# Altium PCB USBHUB.PcbDoc
Units mm, origin at the board's own origin, x right, y up, seen from the top; angles counter-clockwise.
Board outline 31.37 x 90.68 mm, 2 copper layers (Top Layer, Bottom Layer); 37 components, 26 nets, 182 pads, 0 vias.
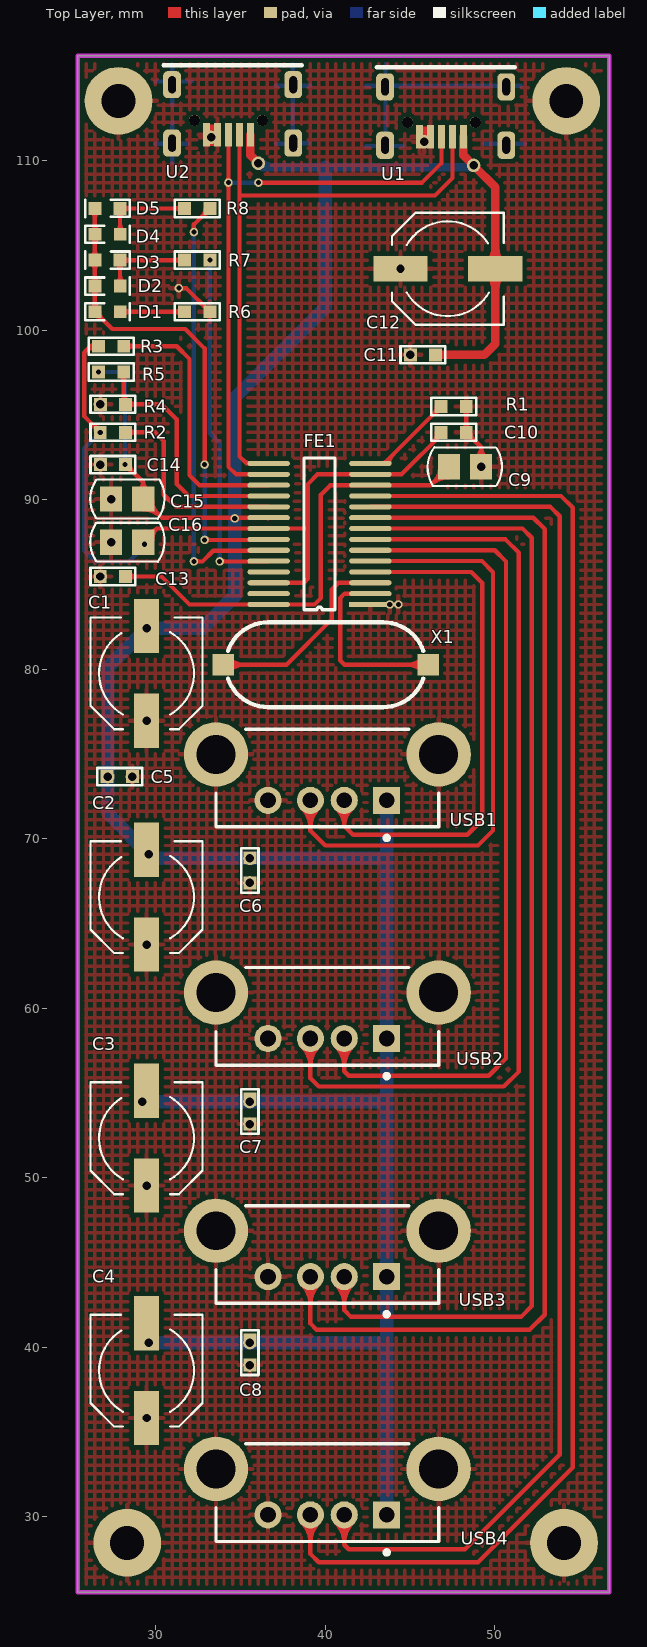
[diagram p0: Top Layer view]
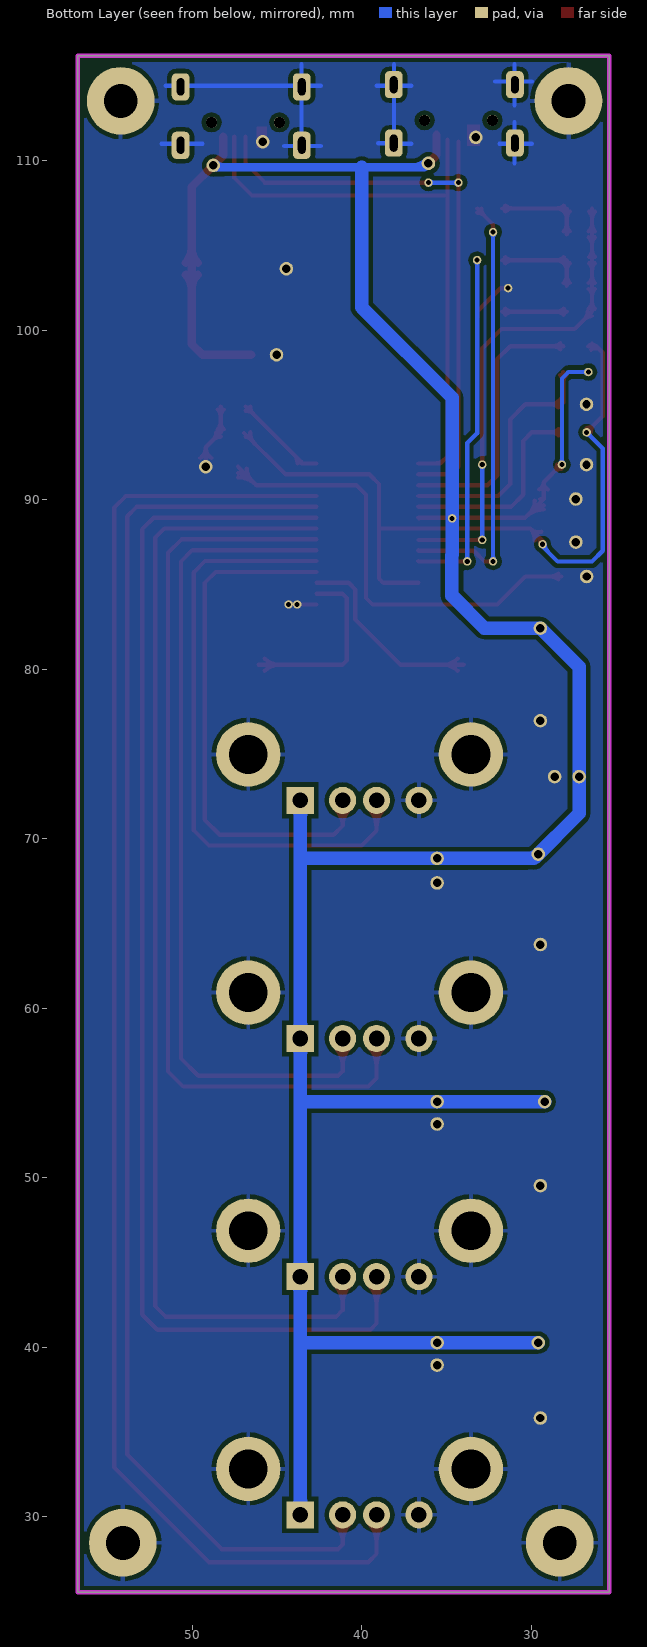
[diagram p1: Bottom Layer view, seen from below]

## Layer stack, top to bottom
Top Solder: solder mask 0.0102, Solder Resist, Dk 3.5
Top Layer: signal copper 0.0356
Dielectric1: dielectric 0.32, FR-4, Dk 4.8
Bottom Layer: signal copper 0.0356
Bottom Solder: solder mask 0.0102, Solder Resist, Dk 3.5

## Board outline
25.4,116.205 56.769,116.205 56.769,25.527 25.4,25.527 25.4,116.205

## Design rules (kind name [scope] priority, off if disabled: settings)
Clearance [All] p1: gap=0.254 ignorepadtopadclearanceinfootprint=FALSE except(0: Arc-Hole Track-Hole SMDPad-Hole THPad-Hole Via-Hole Fill-Hole Poly-Hole Region-Hole Text-Hole)
FabricationTestPointUsage TestPointUsage [All] p1: valid=0 allowmultiple=FALSE
FabricationTestpoint Testpoint [All] p1: side=3 testpointundercomponent=TRUE minsize=1.016 maxsize=2.54 preferedsize=1.524 minholesize=0 maxholesize=1.016 preferedholesize=0.813 testpointgrid=0.025 allowsidetop=TRUE allowsidebottom=TRUE usegrid=TRUE gridtolerance=0
PolygonConnect [All] p1: connectstyle=Relief reliefconductorwidth=0.254 reliefentries=4 polygonreliefangle="90 Angle" airgapwidth=0.254
RoutingVias [All] p1: holewidth=0.711 width=1.27 viastyle="Through Hole" minholewidth=0.711 minwidth=1.27 maxholewidth=0.711 maxwidth=1.27
SilkToSolderMaskClearance SilkscreenOverComponentPads [IsPad] p1: minsilkscreentomaskgap=0.254 clearancetoexposedcopper=TRUE
SolderMaskExpansion [All] p1: expansion=0.102
Width [All] p1: maxlimit=2 minlimit=0.254 preferedwidth=0.254
27 further rules are at their usual default settings.

## Components (designator, comment, footprint, x,y, rotation, side; value= is the part's Value field where it differs from the comment)
C1 "Cap_Pol" cap_220uF/16V 29.464,79.756 r90 top
C2 "Cap_Pol" cap_220uF/16V 29.464,66.548 r90 top
C3 "Cap_Pol" cap_220uF/16V 29.464,52.324 r90 top
C4 "Cap_Pol" cap_220uF/16V 29.464,38.608 r90 top
C5 "Cap1" 0603 27.94,73.66 r180 top
C6 "Cap1" 0603 35.56,68.072 r90 top
C7 "Cap1" 0603 35.56,53.848 r90 top
C8 "Cap1" 0603 35.56,39.624 r90 top
C9 "Cap1" 2012[0805]-C 48.26,91.948 r180 top
C10 "Cap1" 0603 47.647,93.98 r180 top
C11 "Cap1" 0603 45.72,98.552 r0 top
C12 "Cap_Pol" cap_220uF/16V 47.244,103.632 r0 top
C13 "Cap1" 0603 27.534,85.471 r180 top
C14 "Cap1" 0603 27.429,92.075 r0 top
C15 "Cap1" 2012[0805]-C 28.321,90.043 r0 top
C16 "Cap1" 2012[0805]-C 28.321,87.503 r0 top
D1 "LED" 0603-Polar 27.111,101.092 r0 top
D2 "LED" 0603-Polar 27.111,102.616 r0 top
D3 "LED" 0603-Polar 27.216,104.14 r180 top
D4 "LED" 0603-Polar 27.111,105.664 r0 top
D5 "LED" 0603-Polar 27.216,107.188 r180 top
FE1 "FE1.1s" SSOP-28 42.672,83.82 r180 top
R1 "Res1" 0603 47.647,95.504 r180 top
R2 "Res1" 0603 27.534,93.98 r180 top
R3 "Res1" 0603 27.432,99.06 r180 top
R4 "Res1" 0603 27.429,95.631 r0 top
R5 "Res1" 0603 27.432,97.536 r180 top
R6 "Res1" 0603 32.512,101.092 r180 top
R7 "Res1" 0603 32.512,104.14 r180 top
R8 "Res1" 0603 32.512,107.188 r180 top
U1 "Micro-USB" MICRO-USB-F 47.117,113.665 r180 top
U2 "Micro-USB" MICRO-USB-F 34.544,113.792 r180 top
USB1 "USB" USB2.5-2V4A 40.132,76.454 r90 top
USB2 "USB" USB2.5-2V4A 40.132,62.399 r90 top
USB3 "USB" USB2.5-2V4A 40.132,48.345 r90 top
USB4 "USB" USB2.5-2V4A 40.132,34.29 r90 top
X1 "12M" XTAL_SMD 37.592,80.264 r0 top

## Footprints (in the part's own frame and the unit in brackets; to place one, negate y for a bottom-side part, rotate by r counter-clockwise, add the part's x,y. Pads: shape width x height; smd on the part's side, far side on the other; paste and mask are expansions set on the pad)
0603 [mil]
  rect 30x30 smd: 1(-27,0) 2(31.5,0)
  silkscreen extent -50,-20 54,20
0603-Polar [mil]
  rect 30x30 smd: 1(-27,0) 2(31.5,0)
  silkscreen extent -50,-20 54,20
2012[0805]-C [mm] "Chip Resistor; Body 2.0 x 1.3 mm (LxW typ)"
  rect 1.3x1.5 smd: 1(-0.95,0) 2(0.95,0)
  silkscreen extent -2.17,-1.16 2.21,1.14
cap_220uF/16V [mm]
  rect 3.2x1.5 smd: 1(-2.794,0) 2(2.8,0)
  silkscreen extent -3.3,-3.3 3.3,3.3
MICRO-USB-F [mm]
  rrect50% 1.05x1.6 hole 0.45 slot 1 at 90 deg: 0(-3.575,-0.7) 0(-3.575,2.75) 0(3.575,-0.7) 0(3.575,2.75)
  round 0.65 hole 0.65: 0(-1.75,1.4) 0(2.25,1.4)
  rect 0.4x1.4 smd: 1(-1.05,2.25) 2(-0.403,2.25) 3(0.246,2.25) 4(0.897,2.25) 5(1.546,2.25)
  silkscreen extent -4.08,-1.85 4.08,-1.85
SSOP-28 [mm]
  rect 2.5x0.3 smd: 1(0,0)
  oval 2.5x0.3 smd: 2(0,-0.64) 3(0,-1.28) 4(0,-1.92) 5(0,-2.56) 6(0,-3.2) 7(0,-3.84) 8(0,-4.48) 9(0,-5.12) 10(0,-5.76) 11(0,-6.4) 12(0,-7.04) 13(0,-7.68) 14(0,-8.32) 15(6,-8.32) 16(6,-7.68) 17(6,-7.04) 18(6,-6.4) 19(6,-5.76) 20(6,-5.12) 21(6,-4.48) 22(6,-3.84) 23(6,-3.2) 24(6,-2.56) 25(6,-1.92) 26(6,-1.28) 27(6,-0.64) 28(6,0)
  silkscreen extent 2.08,-8.64 3.92,0.32
USB2.5-2V4A [mm] "Connector; USB1.1, Type A, Thru-Hole; 4 Position; Vertical"
  rect 1.6x1.6 hole 0.92: 1(-4.19,-3.5)
  round 1.6 hole 0.92: 2(-4.19,-1) 3(-4.19,1) 4(-4.19,3.5)
  round 3.8 hole 2.3: 5(-1.48,6.57) 6(-1.48,-6.57)
  silkscreen extent -6.53,-6.57 0,6.57, body extent -5.76,-6.57 0,6.57, height 15
XTAL_SMD [mm]
  rect 1.27x1.27 smd: 1(-3.61,0) 2(8.49,0)
  silkscreen extent -3.33,-2.5 8.21,2.5

## Part data
C1 C2 C3 C4 C5 C6 C7 C8 C9 C10 C11 C12 C13 C14 C15 C16: "Capacitor"
D1 D2 D3 D4 D5: library part LED1, "Typical INFRARED GaAs LED"
R1 R2 R3 R4 R5 R6 R7 R8: "Resistor"
X1: library part XTAL_1, "Crystal Oscillator"

## Free pads (board coordinates)
  round 0.5 hole 0.3: 4(32.893,92.075) 7(32.258,105.791) 9(32.258,86.36) 10(32.893,87.63) 11(33.198,104.14) 12(33.782,86.36) 14(26.734,93.98) 15(29.337,87.376) 16(28.194,92.075) 17(26.632,97.536) 23(36.068,108.712) 24(34.298,108.712) 33(34.671,88.9) 54(31.369,102.489) 55(43.815,83.82) 56(44.323,83.82)
  round 0.8 hole 0.5: 21(36.068,109.855) 22(48.768,109.728) 25(29.464,82.423) 26(29.591,69.088) 27(29.21,54.483) 28(29.591,40.259) 29(27.178,73.66) 30(35.56,68.834) 31(35.56,54.483) 32(35.56,40.259) 38(33.274,111.379) 39(45.847,111.125) 40(26.743,95.631) 41(26.743,92.075) 42(27.371,90.043) 43(27.371,87.503) 44(26.734,85.471) 45(29.464,76.962) 46(29.464,63.754) 47(29.464,49.53) 48(29.464,35.814) 49(35.56,38.938) 50(35.56,53.162) 51(35.56,67.386) 52(28.626,73.66) 57(45.034,98.552) 58(44.45,103.632) 59(49.21,91.948)
  round 4 hole 2: 34(27.813,113.538) 35(54.229,113.538) 36(54.102,28.448) 37(28.321,28.448)

## Nets (pads, with @x,y where several pads share a name; then routed paths per layer and width w, separated by ;. In a path a pad name is that pad's centre, name@x,y a point inside that pad or via, vN(x,y) a via of type N, cw(c..) or ccw(c..) an arc to the next point about the centre after c; other vN are vias at no path point)
GND: C1.1 C2.1 C3.1 C4.1 C5.1 C6.1 C7.1 C8.1 C9.1 C10.1 C11.1 C12.1 C13.2 C14.1 C15.1 C16.1 FE1.1 pad.34 pad.35 pad.36 pad.37 pad.38 pad.39 pad.40 pad.41 pad.42 pad.43 pad.44 pad.45 pad.46 pad.47 pad.48 pad.49 pad.50 pad.51 pad.52 pad.54 pad.55 pad.56 pad.57 pad.58 pad.59 R1.1 R4.1 R6.1 U1.4 U1.5 U2.4 U2.5 USB1.4 USB1.5 USB1.6 USB2.4 USB2.5 USB2.6 USB3.4 USB3.5 USB3.6 USB4.4 USB4.5 USB4.6 | length 12.6
  Top Layer w0.254: pad.54 31.801,102.489 R6.1 R6.1@33.198,100.787 ; FE1.1 pad.55 pad.56 ; C10.1@48.153,94.16 ccw(c47.72,94.593) 48.333,94.593 ccw(c48.946,94.593) C10.1@48.512,94.16 ; R1.1@48.153,95.324 cw(c47.72,94.891) 48.333,94.891 cw(c48.946,94.891) R1.1@48.512,95.324 ; C10.1@48.333,93.726 cw(c48.333,93.113) 48.766,93.546 cw(c49.2,93.98) C10.1@48.587,93.98 ; R1.1 C10.1 49.21,93.103 ; C9.1@48.893,92.464 ccw(c48.408,93.103) 49.21,93.103 ; C9.1 49.21,93.103 ; C9.1@49.527,92.464 cw(c50.012,93.103) 49.21,93.103
NetD1_1: D1.1 D2.1 D3.2 D4.1 D5.2 FE1.22 pad.4 pad.10 | length 39
  Top Layer w0.254: D3.2@26.236,103.96 cw(c25.803,103.527) 26.416,103.527 cw(c27.029,103.527) D3.2@26.596,103.96 ; D3.2@26.236,104.32 ccw(c25.803,104.753) 26.416,104.753 ccw(c27.029,104.753) D3.2@26.596,104.32 ; D5.2@26.236,107.008 cw(c25.803,106.575) 26.416,106.575 cw(c27.029,106.575) D5.2@26.596,107.008 ; D1.1@26.246,101.272 ccw(c25.834,101.683) 26.416,101.683 ; D2.1@26.246,102.436 cw(c25.834,102.025) 26.416,102.025 ; D2.1@26.246,102.796 ccw(c25.834,103.207) 26.416,103.207 ; D4.1@26.246,105.484 cw(c25.834,105.073) 26.416,105.073 ; D4.1@26.246,105.844 ccw(c25.834,106.255) 26.416,106.255 ; 26.416,101.727 ccw(c27.061,101.727) D1.1@26.605,101.272 ; 26.416,101.981 cw(c27.061,101.981) D2.1@26.605,102.436 ; 26.416,103.251 ccw(c27.061,103.251) D2.1@26.605,102.796 ; 26.416,105.029 cw(c27.061,105.029) D4.1@26.605,105.484 ; 26.416,106.299 ccw(c27.061,106.299) D4.1@26.605,105.844 ; D5.2 D3.2 26.416,101.101 D1.1 27.441,100.076 31.75,100.076 32.893,98.933 pad.4 ; D1.1@26.425,100.838 cw(c26.425,100.225) 26.859,100.658 cw(c27.292,101.092) D1.1@26.679,101.092 ; pad.4@32.806,92.162 ccw(c32.596,92.372) 32.893,92.372 ccw(c33.19,92.372) pad.4@32.98,92.162 ; pad.10 FE1.22@36.642,87.63 ; pad.10@32.98,87.543 cw(c33.19,87.333) 33.19,87.63 cw(c33.19,87.927) pad.10@32.98,87.717
  Bottom Layer w0.254: pad.10@32.806,87.717 ccw(c32.596,87.927) 32.893,87.927 ccw(c33.19,87.927) pad.10@32.98,87.717 ; pad.4@32.806,91.988 cw(c32.596,91.778) 32.893,91.778 cw(c33.19,91.778) pad.4@32.98,91.988 ; pad.10 pad.4
NetD1_2: D1.2 R6.2 | length 5.7
  Top Layer w0.254: D1.2 R6.2 ; D1.2@28.091,100.912 cw(c28.524,100.479) 28.524,101.092 cw(c28.524,101.705) D1.2@28.091,101.272 ; R6.2@31.532,100.912 ccw(c31.099,100.479) 31.099,101.092 ccw(c31.099,101.705) R6.2@31.532,101.272
NetD2_2: D2.2 D3.1 R7.2 | length 9.2
  Top Layer w0.254: D3.1@27.722,103.96 cw(c27.289,103.527) 27.902,103.527 cw(c28.515,103.527) 28.081,103.96 cw(c28.515,103.527) 28.515,104.14 cw(c28.515,104.753) D3.1@28.081,104.32 ; D2.2@27.731,102.796 ccw(c27.32,103.207) 27.902,103.207 ; D2.2@27.902,102.625 D3.1 R7.2 ; 27.902,103.251 ccw(c28.546,103.251) D2.2@28.091,102.796 ; R7.2@31.532,103.96 ccw(c31.099,103.527) 31.099,104.14 ccw(c31.099,104.753) R7.2@31.532,104.32
NetD4_2: D4.2 D5.1 R8.2 | length 9.2
  Top Layer w0.254: D5.1@27.722,107.008 cw(c27.289,106.575) 27.902,106.575 cw(c28.515,106.575) 28.081,107.008 cw(c28.515,106.575) 28.515,107.188 cw(c28.515,107.801) D5.1@28.081,107.368 ; D4.2@27.731,105.844 ccw(c27.32,106.255) 27.902,106.255 ; D4.2@27.902,105.673 D5.1 R8.2 ; 27.902,106.299 ccw(c28.546,106.299) D4.2@28.091,105.844 ; R8.2@31.532,107.008 ccw(c31.099,106.575) 31.099,107.188 ccw(c31.099,107.801) R8.2@31.532,107.368
NetFE1_2: FE1.2 X1.2 | length 12.8
  Top Layer w0.254: FE1.2 41.153,84.46 40.894,84.201 40.894,80.518 41.148,80.264 X1.2 ; X1.2@45.723,79.905 ccw(c44.856,79.038) 44.856,80.264 ccw(c44.856,81.49) X1.2@45.723,80.623
NetFE1_3: FE1.3 X1.1 | length 13.7
  Top Layer w0.254: X1.1 37.719,80.264 40.386,82.931 40.386,84.709 40.777,85.1 FE1.3 ; X1.1@34.341,79.905 cw(c35.208,79.038) 35.208,80.264 cw(c35.208,81.49) X1.1@34.341,80.623
NetFE1_4: FE1.4 USB1.2 | length 34.8
  Top Layer w0.254: USB1.2@40.682,71.763 cw(c39.777,70.755) 41.132,70.755 ; USB1.2@40.852,71.952 cw(c40.288,71.325) 41.132,71.325 cw(c41.976,71.325) USB1.2@41.412,71.952 ; USB1.2 41.132,70.755 ; USB1.2@41.582,71.763 ccw(c42.487,70.755) 41.132,70.755 ; FE1.4 48.626,85.74 49.276,85.09 49.276,71.12 48.387,70.231 41.656,70.231 41.132,70.755
NetFE1_5: FE1.5 USB1.3 | length 40.2
  Top Layer w0.254: USB1.3@38.656,71.788 cw(c37.507,70.639) 39.132,70.639 cw(c40.757,70.639) USB1.3@39.608,71.788 ; USB1.3@38.836,71.968 cw(c38.12,71.252) 39.132,71.252 cw(c40.144,71.252) USB1.3@39.428,71.968 ; USB1.3 39.132,70.469 40.005,69.596 49.022,69.596 49.911,70.485 49.911,85.725 49.256,86.38 FE1.5
NetFE1_6: FE1.6 USB2.2 | length 53.8
  Top Layer w0.254: USB2.2@40.656,57.733 cw(c39.507,56.585) 41.132,56.585 cw(c42.757,56.585) USB2.2@41.608,57.733 ; USB2.2@40.836,57.913 cw(c40.12,57.198) 41.132,57.198 cw(c42.144,57.198) USB2.2@41.428,57.913 ; USB2.2 41.132,56.277 41.402,56.007 49.657,56.007 50.673,57.023 50.673,86.36 50.013,87.02 FE1.6
NetFE1_7: FE1.7 USB2.3 | length 59.1
  Top Layer w0.254: USB2.3@38.656,57.733 cw(c37.507,56.585) 39.132,56.585 cw(c40.757,56.585) USB2.3@39.608,57.733 ; USB2.3@38.836,57.913 cw(c38.12,57.198) 39.132,57.198 cw(c40.144,57.198) USB2.3@39.428,57.913 ; USB2.3 39.132,55.864 39.624,55.372 50.546,55.372 51.435,56.261 51.435,86.868 50.643,87.66 FE1.7
NetFE1_8: FE1.8 USB3.2 | length 72.7
  Top Layer w0.254: USB3.2@40.656,43.679 cw(c39.507,42.53) 41.132,42.53 cw(c42.757,42.53) USB3.2@41.608,43.679 ; USB3.2@40.836,43.858 cw(c40.12,43.143) 41.132,43.143 cw(c42.144,43.143) USB3.2@41.428,43.858 ; USB3.2 41.132,42.18 41.529,41.783 51.562,41.783 52.197,42.418 52.197,87.757 51.654,88.3 FE1.8
NetFE1_9: FE1.9 USB3.3 | length 78.2
  Top Layer w0.254: USB3.3@38.656,43.679 cw(c37.507,42.53) 39.132,42.53 cw(c40.757,42.53) USB3.3@39.608,43.679 ; USB3.3@38.836,43.858 cw(c38.12,43.143) 39.132,43.143 cw(c40.144,43.143) USB3.3@39.428,43.858 ; USB3.3 39.132,41.386 39.497,41.021 52.07,41.021 52.959,41.91 52.959,88.265 52.284,88.94 FE1.9
NetFE1_10: FE1.10 USB4.2 | length 87.8
  Top Layer w0.254: USB4.2@40.656,29.624 cw(c39.507,28.475) 41.132,28.475 cw(c42.757,28.475) USB4.2@41.608,29.624 ; USB4.2@40.836,29.804 cw(c40.12,29.088) 41.132,29.088 cw(c42.144,29.088) USB4.2@41.428,29.804 ; USB4.2 41.132,28.337 41.402,28.067 48.26,28.067 53.848,33.655 53.848,89.027 53.295,89.58 FE1.10
NetFE1_11: FE1.11 USB4.3 | length 93.3
  Top Layer w0.254: USB4.3@38.656,29.624 cw(c37.507,28.475) 39.132,28.475 cw(c40.757,28.475) USB4.3@39.608,29.624 ; USB4.3@38.836,29.804 cw(c38.12,29.088) 39.132,29.088 cw(c40.144,29.088) USB4.3@39.428,29.804 ; USB4.3 39.132,27.797 39.624,27.305 49.022,27.305 54.61,32.893 54.61,89.535 53.925,90.22 FE1.11
NetFE1_14: FE1.14 R1.2 | length 7.2
  Top Layer w0.254: FE1.14 43.483,92.14 R1.2 ; FE1.14@43.541,92.14 cw(c43.681,92.14) FE1.14@43.582,92.239 ; FE1.14@43.795,92.14 cw(c44.548,92.14) 44.016,92.673 ; R1.2@46.593,95.504 cw(c45.98,95.504) 46.413,95.07 cw(c46.847,94.637) R1.2@46.847,95.25
NetFE1_15: FE1.15 U1.2 U2.2 | length 36.5
  Top Layer w0.254: U2.2@34.947,111.252 34.947,107.95 ; 35.184,92.324 ccw(c35.572,92.711) FE1.15@35.572,92.163 ; FE1.15 35.368,92.14 34.947,92.561 34.947,107.95 ; U1.2 47.52,108.988 46.482,107.95 34.947,107.95
NetFE1_16: FE1.16 pad.23 pad.24 U1.3 U2.3 | length 38.7
  Top Layer w0.254: pad.24@34.211,108.625 cw(c34.001,108.415) 34.298,108.415 cw(c34.594,108.415) pad.24@34.384,108.625 ; pad.24@34.211,108.799 ccw(c34.001,109.009) 34.298,109.009 ccw(c34.594,109.009) pad.24@34.384,108.799 ; U2.3@34.298,111.125 34.298,91.94 34.738,91.5 FE1.16 ; pad.23 45.72,108.712 46.871,109.863 U1.3 ; pad.23@36.155,108.625 cw(c36.365,108.415) 36.365,108.712 cw(c36.365,109.009) pad.23@36.155,108.799
  Bottom Layer w0.254: pad.24 pad.23 ; pad.24@34.384,108.625 cw(c34.594,108.415) 34.594,108.712 cw(c34.594,109.009) pad.24@34.384,108.799 ; pad.23@35.981,108.625 ccw(c35.771,108.415) 35.771,108.712 ccw(c35.771,109.009) pad.23@35.981,108.799
NetFE1_17: FE1.17 R3.1 | length 16.9
  Top Layer w0.254: R3.1 31.242,99.06 32.004,98.298 32.004,91.44 32.584,90.86 FE1.17 ; R3.1@28.297,98.88 cw(c28.731,98.447) 28.731,99.06 cw(c28.731,99.673) R3.1@28.297,99.24
NetFE1_18: FE1.18 R4.2 R5.1 | length 17.3
  Top Layer w0.254: R5.1@27.938,97.356 cw(c27.505,96.923) 28.118,96.923 cw(c28.731,96.923) R5.1@28.297,97.356 ; R5.1 28.118,96.266 ; R4.2@28.357,95.851 cw(c28.599,96.266) 28.118,96.266 ; R4.2@28.408,95.451 cw(c28.842,95.018) 28.842,95.631 cw(c28.842,96.244) R4.2@28.408,95.811 ; FE1.18 31.954,90.22 31.242,90.932 31.242,94.742 30.353,95.631 R4.2 28.118,95.742 28.118,96.266
NetFE1_19: FE1.19 R2.1 | length 13.1
  Top Layer w0.254: R2.1 29.972,93.98 30.48,93.472 30.48,90.297 31.197,89.58 FE1.19 ; R2.1@28.399,93.8 cw(c28.833,93.367) 28.833,93.98 cw(c28.833,94.593) R2.1@28.399,94.16
NetFE1_23: FE1.23 pad.7 pad.9 R8.1 | length 28.7
  Top Layer w0.254: pad.7@32.171,105.878 ccw(c31.961,106.088) 32.258,106.088 ccw(c32.555,106.088) pad.7@32.345,105.878 ; pad.9 32.766,86.36 33.401,86.995 36.647,86.995 FE1.23 ; pad.7 32.258,106.248 R8.1 ; pad.9@32.345,86.273 cw(c32.555,86.063) 32.555,86.36 cw(c32.555,86.657) pad.9@32.345,86.447 ; R8.1@32.944,107.188 cw(c32.331,107.188) 32.764,106.754 cw(c33.198,106.321) R8.1@33.198,106.934
  Bottom Layer w0.254: pad.9@32.171,86.447 ccw(c31.961,86.657) 32.258,86.657 ccw(c32.555,86.657) pad.9@32.345,86.447 ; pad.7@32.171,105.704 cw(c31.961,105.494) 32.258,105.494 cw(c32.555,105.494) pad.7@32.345,105.704 ; pad.9 pad.7
NetFE1_24: FE1.24 pad.11 pad.12 R7.1 | length 22.3
  Top Layer w0.254: pad.12 36.652,86.36 FE1.24 ; pad.12@33.869,86.273 cw(c34.079,86.063) 34.079,86.36 cw(c34.079,86.657) pad.12@33.869,86.447
  Bottom Layer w0.254: pad.11@33.111,104.053 cw(c32.901,103.843) 33.198,103.843 cw(c33.495,103.843) pad.11@33.285,104.053 ; pad.11 33.198,93.929 33.782,93.345 pad.12 ; pad.12@33.695,86.447 ccw(c33.485,86.657) 33.782,86.657 ccw(c34.079,86.657) pad.12@33.869,86.447
VCC1_8: C9.2 C13.1 FE1.12 FE1.28 | length 30.4
  Top Layer w0.254: C13.1 30.353,85.471 32.004,83.82 FE1.28 39.37,83.82 39.751,84.201 39.751,90.297 40.314,90.86 FE1.12 46.222,90.86 C9.2 ; C13.1@28.399,85.291 cw(c28.833,84.858) 28.833,85.471 cw(c28.833,86.084) C13.1@28.399,85.651 ; 46.246,90.884 cw(c47.31,89.821) C9.2@47.31,91.325 ; 46.488,91.126 ccw(c45.766,91.848) C9.2@46.787,91.848 ; C9.2@46.68,91.318 cw(c47.31,90.688) C9.2@47.31,91.579
VCC3_3: C10.2 C16.2 FE1.13 FE1.21 FE1.26 pad.14 pad.15 R2.2 R3.2 | length 53
  Top Layer w0.254: 25.915,98.813 cw(c26.527,98.2) R3.2 ; 25.927,98.825 cw(c26.221,98.531) R3.2@26.476,98.859 ; 26.131,99.029 cw(c26.399,98.76) R3.2 ; R3.2@26.42,98.921 ccw(c26.162,98.752) 26.162,99.06 ; R3.2@26.42,99.199 cw(c26.162,99.368) 26.162,99.06 ; R2.2@26.48,93.98 ccw(c25.867,93.98) 26.3,94.414 ccw(c26.734,94.847) R2.2@26.734,94.234 ; R2.2@26.611,93.98 ccw(c26.314,93.98) 26.524,94.19 ccw(c26.734,94.4) R2.2@26.734,94.103 ; R2.2 25.781,94.933 25.781,98.679 26.162,99.06 ; C16.2 30.068,88.3 ; C16.2@29.395,88.111 ccw(c29.563,88.805) 30.068,88.3 ; C16.2@29.46,87.376 cw(c30.223,87.376) C16.2@29.683,87.915 ; C16.2@29.794,87.615 cw(c30.73,87.638) 30.068,88.3 ; FE1.26 38.745,85.1 38.989,85.344 38.989,90.932 39.557,91.5 FE1.13 44.51,91.5 C10.2@46.952,93.942 ; 38.954,88.3 FE1.21 30.068,88.3 ; 46.312,93.302 ccw(c45.635,93.98) C10.2@46.593,93.98 ; C10.2@46.658,93.648 cw(c46.847,93.458) C10.2@46.847,93.726 ; 26.162,99.06 R3.2
  Bottom Layer w0.254: pad.14@26.611,93.98 cw(c26.314,93.98) 26.524,93.77 cw(c26.734,93.56) pad.14@26.734,93.857 ; pad.14 25.781,93.027 25.781,86.995 26.416,86.36 28.448,86.36 29.337,87.249 pad.15 ; 29.037,86.949 ccw(c28.61,87.376) pad.15@29.214,87.376
VCC5: C1.2 C2.2 C3.2 C4.2 C5.2 C6.2 C7.2 C8.2 C11.2 C12.2 C14.2 C15.2 FE1.20 pad.16 pad.17 pad.21 pad.22 pad.25 pad.26 pad.27 pad.28 pad.29 pad.30 pad.31 pad.32 pad.33 R5.2 U1.1 U2.1 USB1.1 USB2.1 USB3.1 USB4.1 | length 204
  Top Layer w0.254: C14.2@28.194,91.952 cw(c28.194,91.571) C14.2@28.464,91.84 ; C14.2@28.229,91.821 cw(c28.229,91.208) 28.662,91.641 cw(c29.096,92.075) C14.2@28.483,92.075 ; C14.2 29.271,91.033 ; C15.2@29.017,90.6 ccw(c28.775,91.033) 29.271,91.033 ; C15.2@29.271,89.42 cw(c29.271,87.916) 30.335,88.979 ; C15.2@29.271,89.674 cw(c29.271,88.783) C15.2@29.901,89.413 ; C15.2@29.464,90.043 C15.2 ; C15.2@29.525,90.6 cw(c29.767,91.033) 29.271,91.033 ; C15.2@29.794,89.943 ccw(c30.815,89.943) 30.093,89.221 ; 34.277,88.94 cw(c34.277,88.506) pad.33@34.584,88.813 ; pad.33@34.758,88.813 cw(c35.065,88.506) 35.065,88.94 ; FE1.20@36.632,88.9 FE1.20 30.374,88.94 C15.2 ; C15.2 29.271,91.033
  Top Layer w0.5: U2.1 35.594,110.329 pad.21 ; C11.2 49.403,98.552 50.044,99.193 C12.2 50.044,108.452 pad.22 48.167,110.329 U1.1 ; C12.2@49.69,103.278 cw(c48.837,102.425) 50.044,102.425 cw(c51.251,102.425) C12.2@50.398,103.278 ; C12.2@49.69,103.986 ccw(c48.837,104.839) 50.044,104.839 ccw(c51.251,104.839) C12.2@50.398,103.986
  Bottom Layer w0.254: pad.17 27.813,97.536 28.194,97.155 pad.16 ; pad.17@26.719,97.449 cw(c26.929,97.239) 26.929,97.536 cw(c26.929,97.833) pad.17@26.719,97.623 ; pad.16@28.107,92.162 ccw(c27.897,92.372) 28.194,92.372 ccw(c28.491,92.372) pad.16@28.281,92.162
  Bottom Layer w0.5: pad.21 36.312,109.611 40.005,109.611 48.651,109.611 pad.22 ; pad.21@36.174,109.961 ccw(c37.019,110.806) 37.019,109.611 ; 48.123,109.611 ccw(c48.123,110.373) pad.22@48.662,109.834
  Bottom Layer w0.8: pad.27 43.632,54.483 ; pad.28 43.632,40.259 ; pad.26 ccw(c30.204,69.701) 30.204,68.834 ; 40.005,109.611 40.005,101.346 34.671,96.012 34.671,86.749 34.686,86.734 34.686,84.343 32.766,82.423 pad.25 27.178,80.137 27.178,71.501 29.845,68.834 43.505,68.834 ; USB4.1@43.349,30.383 ccw(c42.666,31.066) 43.632,31.066 ccw(c44.598,31.066) USB4.1@43.915,30.383 ; USB3.1@43.349,43.872 cw(c42.666,43.189) 43.632,43.189 cw(c44.598,43.189) USB3.1@43.915,43.872 ; USB3.1@43.349,44.438 ccw(c42.666,45.12) 43.632,45.12 ccw(c44.598,45.12) USB3.1@43.915,44.438 ; USB2.1@43.349,57.926 cw(c42.666,57.244) 43.632,57.244 cw(c44.598,57.244) USB2.1@43.915,57.926 ; USB2.1@43.349,58.492 ccw(c42.666,59.175) 43.632,59.175 ccw(c44.598,59.175) USB2.1@43.915,58.492 ; USB1.1@43.349,71.981 cw(c42.666,71.298) 43.632,71.298 cw(c44.598,71.298) USB1.1@43.915,71.981 ; USB4.1 USB3.1 43.632,54.483 ; USB1.1 USB2.1 43.632,54.483
pads on no net: FE1.25 FE1.27 U1.0 U2.0
copper on no net: | length 36
  Bottom Layer w0.254: 29.972,110.998 31.877,110.998 ; 29.972,114.681 32.131,114.681 ; 30.988,109.855 30.988,112.268 ; 30.988,113.284 30.988,115.697 ; 37.084,110.998 38.075,110.998 38.1,111.023 ; 37.084,114.427 39.116,114.427 ; 38.1,115.697 38.1,114.492 38.1,111.023 ; 39.033,111.042 38.119,111.042 38.1,111.023 ; 42.418,110.871 44.577,110.871 ; 42.418,114.427 51.562,114.427 ; 43.561,110.934 43.561,115.697 ; 49.403,110.998 51.816,110.998

## Polygon pours and split planes (outlines as drawn)
GND on Bottom Layer "Bottom Layer-No Net" (solid, pour order 2): 25.4,116.205 56.769,116.205 56.769,25.527 25.4,25.527 25.4,116.205
GND on Top Layer "Bottom Layer-No Net" (hatched 90Degree grid 0.508 track 0.203, pour order 0): 25.4,116.205 56.769,116.205 56.769,25.527 25.4,25.527 25.4,116.205

## Keep-outs
Keep-Out Layer:
  the board outline again, w0.254

## Other copper
Top Layer:
  rectangle net GND: 45.593,110.744 46.228,112.014
  rectangle net GND: 33.02,110.871 33.782,112.141